# Altium PCB PCI Express Mini_3000X5095_52PIN_Full-Mini-Type F1.PCBDOC (part 8 of 8)
Units mm, origin at the board's own origin, x right, y up, seen from the top; angles counter-clockwise.
Board outline 70 x 83.2 mm, 6 copper layers (TopLayer, Layer 1, Layer 2, Layer 3, Layer 4, Bottom Layer), stack 0.914 mm thick; 380 components, 252 nets, 1258 pads, 603 vias.
Unrouted connection lines stored in the file: 10.
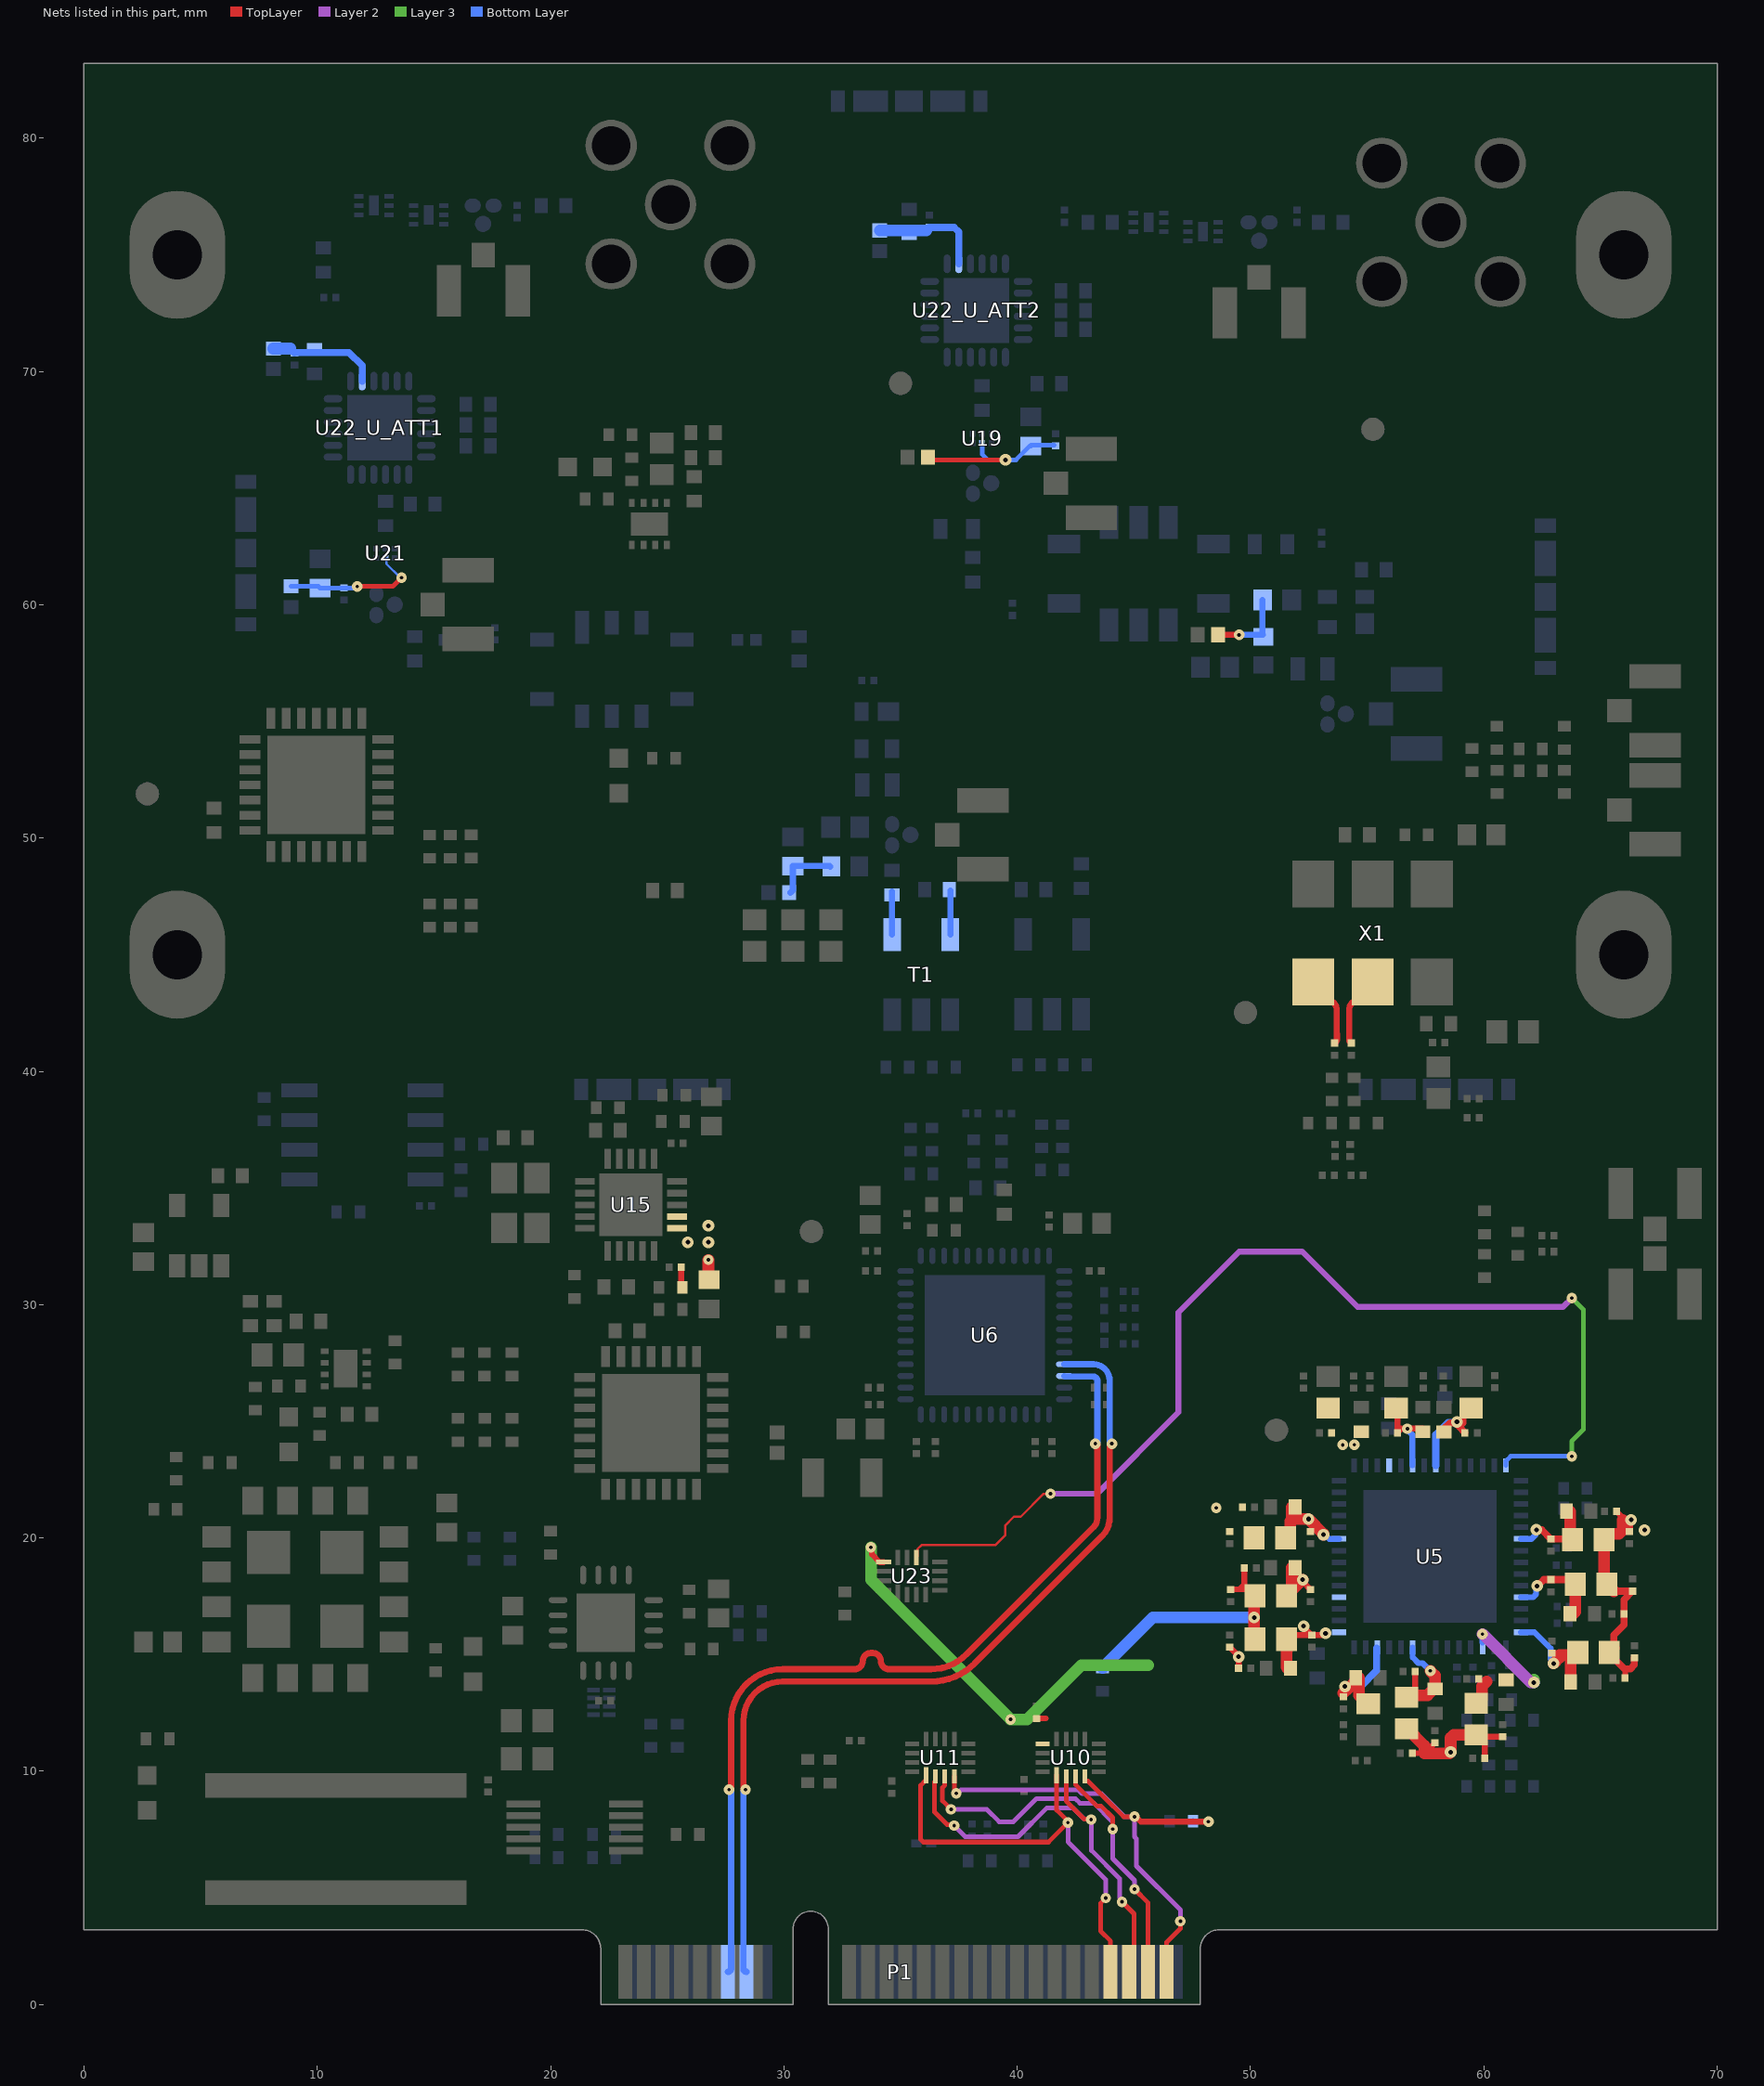
[diagram p9: the nets of this part, all layers, seen from the top]

## Via types
v1: diameter 0.45, hole 0.15, TopLayer to Bottom Layer, tented both sides, 332 vias
v2: diameter 0.5, hole 0.2, TopLayer to Bottom Layer, tented both sides, 214 vias
v3: diameter 0.5, hole 0.2, TopLayer to Bottom Layer, 32 vias
v4: diameter 0.45, hole 0.15, TopLayer to Bottom Layer, 25 vias

## Nets (pads, with @x,y where several pads share a name; then routed paths per layer and width w, separated by ;. In a path a pad name is that pad's centre, name@x,y a point inside that pad or via, vN(x,y) a via of type N, cw(c..) or ccw(c..) an arc to the next point about the centre after c; other vN are vias at no path point) (continued)
SPI_1V8_CLK: C71.1 C113.2 C114.2 C117.2 C118.2 C121.2 C122.2 C125.2 C126.2 C131.2 C132.2 C135.2 C136.2 C141.2 C142.2 C143.2 C144.2 C147.2 C148.2 FB13.1 FB14.1 FB16.1 FB17.1 FB18.1 FB19.1 FB20.1 FB21.1 R12.2 R102.2 U10.13 U15.11 U15.12 U23.13 | length 50.9
  TopLayer w0.25: R102.2@25.596,30.74 25.601,30.745 25.601,31.591 C142.2@25.606,31.596 ; v1(33.732,19.594) 33.77,19.556 33.77,19.296 34.102,18.964 U23.13@34.277,18.964 ; C71.1@40.84,12.264 41.23,12.264 ; C118.2@49.099,15.316 49.109,15.316 49.495,14.93 v2(49.495,14.909) 49.491,14.904 49.491,14.418 C117.2@49.487,14.414 ; C125.2@49.14,17.796 49.528,17.796 ; C126.2@49.739,18.718 49.739,18.007 49.528,17.796 ; FB17.1@50.197,17.514 49.915,17.796 49.528,17.796 ; C148.2@56.944,10.769 57.453,10.769 C147.2@57.909,11.225 ; FB13.1@59.671,11.565 59.712,11.565 FB13.1@59.799,11.479 ; C114.2@60.037,10.557 60.037,11.24 FB13.1@59.799,11.479 ; C113.2@60.802,11.479 FB13.1@59.799,11.479 ; C121.2@65.695,21.145 65.695,21.135 65.955,20.875 65.955,20.777 ; 66.033,14.384 66.059,14.358 C144.2@66.059,13.993 ; C122.2@66.24,20.269 66.265,20.294 66.265,20.729 v2(66.313,20.777)
  TopLayer w0.3: FB20.1@65.379,15.038 66.033,14.384 66.281,14.384 66.457,14.56 C143.2@66.457,14.853 ; FB18.1@65.571,17.717 C132.2@66.373,17.717 66.009,17.354 C131.2@66.009,16.751 66.009,16.271 65.579,15.841 FB20.1@65.579,15.288
  TopLayer w0.5: v4(26.764,31.921) 26.764,31.089 C141.2@26.788,31.065 ; FB14.1@50.197,15.657 50.161,15.693 v2(50.161,16.586) 50.161,17.478 FB17.1@50.197,17.514 ; FB21.1@56.684,11.817 56.734,11.817 57.453,11.098 57.453,10.769 58.526,10.769 v2(58.578,10.821) 58.578,11.43 58.714,11.565 FB13.1@59.671,11.565 ; FB20.1@65.379,15.038 FB20.1@65.379,15.088 FB20.1@65.579,15.288 ; FB18.1@65.571,17.717 65.524,17.764 65.474,17.764 65.274,17.964 FB18.1@65.274,18.014 65.156,18.132 65.156,19.978 65.356,20.178 65.794,20.178 65.955,20.34 65.955,20.777
  Layer 3 w0.5: v1(33.732,19.594) 33.732,18.207 v4(39.717,12.222) 40.425,12.222 42.754,14.55 45.61,14.55 45.615,14.545
  Bottom Layer w0.25: R12.2@43.647,14.39 R12.2@43.658,14.379
  Bottom Layer w0.5: R12.2@43.658,14.429 45.814,16.586 v2(50.161,16.586)
  other v1: 48.532,21.289
  other v2: 66.89,20.338 25.883,32.673 26.764,32.673 26.764,33.382
SPI_CLK_MB: P1.45 U10.1 U11.1 | length 19.2
  TopLayer w0.2: U11.1@36.1,9.829 36.1,9.579 36.05,9.579 35.863,9.392 35.863,7.08 35.98,6.963 41.341,6.963 v4(42.176,7.798) 42.176,7.855 41.695,8.336 U10.1@41.695,9.829 ; v1(43.797,4.566) 43.572,4.341 43.572,3.149 44,2.721 P1.45@44,1.4
  Layer 2 w0.2: v4(42.176,7.798) 42.176,6.974 43.797,5.353 v1(43.797,4.566)
SPI_MISO_MB: P1.49 U10.3 U11.3 | length 19.7
  TopLayer w0.2: U11.3@36.9,9.779 36.9,9.392 36.8,9.292 36.8,8.731 v1(37.165,8.366) ; U10.3@42.495,9.779 42.495,9.425 43.411,8.51 43.591,8.51 44.096,8.006 v4(44.096,7.517) ; v1(45.027,4.946) 45.6,4.373 P1.49@45.6,1.4
  Layer 2 w0.2: v1(37.165,8.366) 38.694,8.366 39.224,7.835 39.833,7.835 40.823,8.826 42.492,8.826 42.686,8.632 43.293,8.632 44.096,7.829 v4(44.096,7.517) 44.096,6.254 45.027,5.323 v1(45.027,4.946)
SPI_MOSI_MB: P1.47 U10.2 U11.2 | length 19.3
  TopLayer w0.2: U11.2@36.5,9.779 36.5,9.579 36.45,9.529 36.45,8.254 36.987,7.716 37.251,7.716 v1(37.299,7.668) ; U10.2@42.095,9.779 42.095,8.728 42.873,7.95 43.148,7.95 v4(43.17,7.928) ; v1(44.494,4.402) 45.006,3.89 45.006,2.567 45,2.561 45,1.6 P1.47@44.8,1.4
  Layer 2 w0.2: v1(37.299,7.668) 37.776,7.191 40.033,7.191 41.261,8.419 42.404,8.419 42.873,7.95 43.066,7.95 43.089,7.928 v4(43.17,7.928) ; v4@43.183,7.95 43.183,6.601 44.384,5.4 44.384,4.566 44.494,4.456 v1(44.494,4.402)
SPI_nCS_1_MB: P1.51 R64.2 U10.4 U11.4 | length 23.5
  TopLayer w0.2: U11.4@37.3,9.779 37.3,9.173 37.385,9.088 v1(37.385,9.049) ; U10.4@42.895,9.779 42.895,9.579 43.031,9.579 43.75,8.86 ; 43.751,8.86 44.559,8.052 v4(45.027,8.052) ; P1.51@46.4,1.4 46.4,2.665 46.995,3.26 v1(46.995,3.569)
  TopLayer w0.25: v4(45.027,8.052) 45.081,8.052 45.298,7.835 v1(48.197,7.835)
  Layer 2 w0.2: v1(37.385,9.049) 37.453,9.049 37.595,9.192 42.621,9.192 42.777,9.036 43.615,9.036 44.599,8.052 v4(45.027,8.052) 45.027,7.191 45.11,7.107 45.11,5.939 46.995,4.054 v1(46.995,3.569)
  Bottom Layer w0.25: R64.2@47.532,7.858 47.544,7.846 48.185,7.846 v1(48.197,7.835)
Sync_04610: U5.14 U23.10 | length 47.9
  TopLayer w0.1: U23.10@35.677,19.164 35.727,19.214 35.727,19.522 35.898,19.694 39.063,19.694 39.481,20.113 39.481,20.527 39.864,20.909 40.149,20.909 41.131,21.892 v1(41.431,21.892)
  Layer 2 w0.25: v1(41.431,21.892) 43.416,21.892 46.912,25.387 46.912,29.67 49.516,32.273 52.216,32.273 54.588,29.902 63.394,29.902 v1(63.775,30.282)
  Layer 3 w0.2: v1(63.775,23.499) 63.775,24.151 64.263,24.639 64.263,29.795 v1(63.775,30.282)
  Bottom Layer w0.2: U5.14@60.943,23.106 60.943,23.286 61.156,23.499 v1(63.775,23.499)
SYNC_N: P1.12 U6.22 | length 38.9
  TopLayer w0.267: v1(27.645,9.209) ccw(c27.645,9.3) 27.737,9.3 27.737,10.722 27.74,10.722 27.74,12.169 cw(c29.945,12.169) 29.945,14.373 32.899,14.373 33.033,14.373 ccw(c33.033,14.722) 33.381,14.722 cw(c33.73,14.722) 33.73,15.07 33.808,15.07 cw(c33.808,14.722) 34.156,14.722 ccw(c34.505,14.722) 34.505,14.373 36.313,14.373 36.739,14.417 ccw(c36.313,16.476) 36.872,14.449 ccw(c36.313,16.476) 37.8,14.989 43.265,20.454 ccw(c42.842,20.876) 43.44,20.876 43.44,23.947 ccw(c43.348,23.947) v1(43.348,24.039)
  Bottom Layer w0.267: P1.12@27.6,1.4 ccw(c27.6,1.537) 27.737,1.537 27.737,9.117 ccw(c27.645,9.117) v1(27.645,9.209) ; U6.22@42.017,26.942 42.044,26.915 43.264,26.915 cw(c43.264,26.743) 43.437,26.743 43.437,24.128 cw(c43.348,24.128) v1(43.348,24.039)
SYNC_P: P1.14 U6.21 | length 39.1
  TopLayer w0.267: v1(28.355,9.209) cw(c28.355,9.3) 28.264,9.3 28.264,12.169 28.267,12.169 cw(c29.945,12.169) 29.945,13.846 36.314,13.846 ccw(c36.314,16.474) 38.172,14.616 43.639,20.083 ccw(c42.848,20.874) 43.967,20.874 43.967,23.947 cw(c44.058,23.947) v1(44.058,24.039)
  Bottom Layer w0.267: P1.14@28.267,1.533 P1.14@28.4,1.4 cw(c28.4,1.536) 28.264,1.536 28.264,9.117 cw(c28.355,9.117) v1(28.355,9.209) ; U6.21@42.017,27.442 43.264,27.442 cw(c43.264,26.743) 43.964,26.743 43.964,24.133 ccw(c44.058,24.133) v1(44.058,24.039)
TorRF_50Ohm_20: C175.1 T1.5 | length 1.8
  Bottom Layer w0.268: T1.5@34.637,45.859 C175.1@34.637,47.7
TorRF_50Ohm_21: C156.1 T1.4 | length 1.9
  Bottom Layer w0.269: T1.4@37.137,45.859 C156.1@37.137,47.755
Vcc_2V8_Tor1: C176.2 C177.2 FB22.2 U21.2 | length 6.1
  TopLayer w0.2: v1(11.709,60.786) 13.232,60.786 13.609,61.163 v1(13.611,61.163)
  Bottom Layer w0.1: U21.2@12.961,61.976 12.966,61.972 12.966,61.755 13.558,61.163 v1(13.611,61.163)
  Bottom Layer w0.2: FB22.2@8.876,60.786 10.056,60.786 C176.2@10.121,60.721 C177.2@11.149,60.721 11.59,60.721 11.655,60.786 v1(11.709,60.786)
Vcc_2V8_Tor2: C165.2 C166.2 FB23.2 U19.2 | length 7.3
  TopLayer w0.2: FB23.2@36.181,66.331 36.297,66.215 v2(39.498,66.215)
  Bottom Layer w0.2: U19.2@38.498,66.931 38.498,66.448 38.732,66.215 v2(39.498,66.215) 39.947,66.215 40.539,66.807 C165.2@40.589,66.807 ; C165.2@40.589,66.837 C166.2@41.585,66.837
Vcc_5V_AMP_1: C171.1 FB26.2 R126.2 | length 2.8
  Bottom Layer w0.269: FB26.2@30.28,47.665 30.384,47.769 C171.1@30.384,48.803 31.96,48.803 R126.2@31.983,48.78
Vcc_5V_AMP_2: C161.1 FB27.2 R84.2 | length 3.4
  TopLayer w0.268: FB27.2@48.615,58.715 FB27.2@48.618,58.712
  TopLayer w0.269: FB27.2@48.618,58.712 v1@49.507,58.712
  TopLayer w0.279: v1@49.507,58.712 v1(49.51,58.71)
  Bottom Layer w0.268: R84.2@50.516,58.71 C161.1@50.516,60.21
  Bottom Layer w0.269: v1(49.51,58.71) R84.2@50.516,58.71
Vcc_5V_ATT_1: C180_U_ATT1.2 C181_U_ATT1.2 FB24.2 U22_U_ATT1.2 | length 4.8
  Bottom Layer w0.3: 8.846,70.98 C180_U_ATT1.2@9.026,70.8 9.041,70.815 11.358,70.815 11.926,70.247 U22_U_ATT1.2@11.926,69.581
  Bottom Layer w0.5: FB24.2@8.118,70.98 8.846,70.98
Vcc_5V_ATT_2: C180_U_ATT2.2 C181_U_ATT2.2 FB25.2 U22_U_ATT2.2 | length 4.7
  Bottom Layer w0.3: C180_U_ATT2.2@36.232,76.174 37.307,76.174 37.498,75.983 U22_U_ATT2.2@37.498,74.614
  Bottom Layer w0.5: FB25.2@34.108,76.044 35.385,76.044 C180_U_ATT2.2@36.102,76.044
VCXO_OUT_N: C43.2 X1.5 | length 3.1
  TopLayer w0.267: C43.2@54.271,41.256 54.313,41.215 C43.2@54.323,41.215 ; C43.2@54.271,41.256 cw(c54.371,41.356) 54.23,41.356 54.23,42.136 54.227,42.14 54.227,42.627 cw(c54.66,42.627) 54.354,42.933 cw(c54.425,42.862) 54.425,42.963 ccw(c54.425,43.064) X1.5@54.496,42.992 ; X1.5@54.496,42.993 55.162,43.659 ccw(c54.992,43.829) X1.5@55.233,43.829
VCXO_OUT_P: C40.2 X1.4 | length 3.1
  TopLayer w0.267: X1.4@52.693,43.829 ccw(c52.935,43.829) 52.764,43.659 53.43,42.993 ccw(c53.501,43.064) 53.501,42.963 cw(c53.501,42.862) 53.573,42.933 cw(c53.267,42.627) 53.7,42.627 53.7,41.616 53.703,41.613 53.703,41.356 cw(c53.562,41.356) 53.661,41.256 53.62,41.215 C40.2@53.61,41.215
VDD_CORE: C95.2 C96.2 FB8.2 U5.8 | length 4.6
  TopLayer w0.3: C96.2@58.285,24.683 58.54,24.937 58.81,24.937 v2(58.848,24.976) ; v2@58.848,24.846 59.029,24.846 59.104,24.921 59.104,25.263 59.404,25.563 FB8.2@59.454,25.563 ; v2@58.947,24.764 59.194,24.518 C95.2@59.194,24.508
  Bottom Layer w0.3: U5.8@57.943,23.106 57.943,24.426 58.472,24.956 58.828,24.956 v2(58.848,24.976)
VDD_IO: C115.2 C116.2 FB13.2 U5.31 | length 4.7
  TopLayer w0.5: FB13.2@59.671,12.915 59.721,12.915 59.921,13.115 59.921,13.643 60.127,13.85
  Layer 2 w0.5: v1(59.943,15.877) 62.015,13.805 v2(62.144,13.805)
  Layer 3 w0.5: v2(62.144,13.805) v2@62.144,13.929
  Bottom Layer w0.25: U5.31@59.943,15.521 v1(59.943,15.877)
VDD_OSC: C149.2 C150.2 FB21.2 U5.37 | length 4.9
  TopLayer w0.25: FB21.2@56.684,13.167 56.729,13.167 56.929,13.367 57.054,13.492 C149.2@57.054,14.273
  TopLayer w0.5: FB21.2@56.684,13.167 56.773,13.256 57.584,13.256 57.859,13.531 C150.2@57.909,13.531 57.909,14.1 v1(57.708,14.301)
  Bottom Layer w0.25: U5.37@56.951,15.298 56.951,14.874 57.191,14.634 57.375,14.634 v1(57.708,14.301)
VDD_PLL1: C99.2 C100.2 FB9.2 U5.40 | length 4.8
  TopLayer w0.5: 53.978,13.352 54.153,13.528 54.637,14.012 54.642,14.012 54.642,13.251 54.999,12.894 FB9.2@55.049,12.894
  Bottom Layer w0.3: v2(54.045,13.636) 54.72,13.636 55.409,14.325 U5.40@55.409,15.273
VDD_PLL2CORE: C103.2 C104.2 FB10.2 U5.6 | length 3.7
  TopLayer w0.25: FB10.2@56.239,25.563 56.297,25.505 C103.2@56.297,24.514 ; C103.2@56.297,24.504 C103.2@56.297,24.514 ; 56.471,24.688 C103.2@56.297,24.514 ; v1@56.724,24.688 C104.2@57.383,24.688
  Bottom Layer w0.25: v1(56.724,24.682) 56.724,24.642 56.943,24.423 U5.6@56.943,23.106
VDD_PLL2OSC: C107.2 C108.2 FB11.2 U5.4
  other v1: 53.951,23.989 54.447,23.992
VDDO_1/2: C123.2 C124.2 FB16.2 U5.20 | length 3.9
  TopLayer w0.3: v2(62.255,20.345) 62.479,20.345 62.874,19.95 C123.2@62.884,19.96 FB16.2@63.775,19.96
  TopLayer w0.5: C124.2@63.675,21.145 63.68,21.145 63.7,21.125 63.7,20.035 63.775,19.96 FB16.2@63.806,19.928
  Bottom Layer w0.25: U5.20@61.593,19.956 62.04,19.956 62.208,20.123 62.208,20.298 v2(62.255,20.345)
VDDO_3/4: C133.2 C134.2 FB18.2 U5.25 | length 4.2
  TopLayer w0.3: v2(62.289,17.94) 62.562,18.214 C133.2@62.884,18.214 FB18.2@63.725,18.214
  TopLayer w0.5: FB18.2@63.725,18.214 FB18.2@63.924,18.014 63.924,16.841 63.834,16.751 C134.2@63.829,16.751
  Bottom Layer w0.25: U5.25@61.593,17.456 62.109,17.456 62.241,17.588 62.241,17.892 v2(62.289,17.94)
VDDO_5: C145.2 C146.2 FB20.2 U5.28 | length 5.1
  TopLayer w0.25: C145.2@62.911,15.064 63.236,15.064
  TopLayer w0.5: v2(62.987,14.615) 63.236,14.864 ; 63.236,14.977 63.918,14.977 FB20.2@64.029,15.088 FB20.2@63.84,14.899 ; C146.2@63.722,13.824 FB20.2@63.722,14.899
  Bottom Layer w0.25: U5.28@61.593,15.956 62.172,15.956 62.862,15.266 62.862,14.808 62.987,14.683 v2(62.987,14.615)
VDDO_6: C119.2 C120.2 FB14.2 U5.43 | length 3.6
  TopLayer w0.25: FB14.2@51.547,15.657 51.725,15.836 C119.2@52.624,15.836 ; v2(52.277,16.216) 52.277,16.182 C119.2@52.624,15.836 ; v2(53.217,15.911) 53.149,15.911 53.073,15.836 C119.2@52.634,15.836 C119.2@52.624,15.836
  TopLayer w0.5: FB14.2@51.547,15.657 51.565,15.639 51.565,15.176 51.54,15.151 51.54,14.458 C120.2@51.584,14.414
VDDO_7/8: C127.2 C128.2 FB17.2 U5.46 | length 2.2
  TopLayer w0.25: v2(52.235,18.211) 52.282,18.163 52.282,18.079 52.566,17.796 C127.2@52.576,17.796
  TopLayer w0.5: C128.2@51.773,18.718 51.773,17.749 v2(52.235,18.211)
VDDO_9/10: C137.2 C138.2 FB19.2 U5.51 | length 3.8
  TopLayer w0.5: FB19.2@51.5,20.009 51.7,20.209 51.7,20.72 51.764,20.784 ; C138.2@51.778,21.323 51.764,21.309 51.764,20.784 ; v2(53.128,20.14) 53.128,20.172 v2(52.488,20.811) 51.792,20.811 51.764,20.784
  Bottom Layer w0.25: v2(53.128,20.14) 53.195,20.14 53.379,19.956 U5.51@53.793,19.956
pads on no net: D8_U_RF_ANT_L.1 D8_U_RF_ANT_L.3 D8_U_RF_ANT_L.4 D8_U_RF_ANT_L.6 D8_U_RF_ANT_M.1 D8_U_RF_ANT_M.3 D8_U_RF_ANT_M.4 D8_U_RF_ANT_M.6 FID1.0 FID2.0 FID3.0 FID4.0 FID5.0 FID6.0 H1.1 H2.1 H3.1 H4.1 H5.1 T1.2 T2.2 U1.5 U1.6 U1.7 U1.8 U1.14 U1.15 U3.6 U4.6 U5. U5.1 U5.2 U5.3 U5.18 U5.19 U5.23 U5.24 U5.35 U5.36 U5.44 U5.45 U5.47 U5.48 U5.52 U5.53 U5.56 U6.27 U6.28 U6.33 U6.34 U7.7 U7.10 U7.15 U7.16 U8.7 U8.10 U8.15 U8.16 U8.25 U8.26 U8.27 U14.8 U17.1 U17.2 U23.5 U23.14 U23.15 X1.2

## Polygon pours and split planes (outlines as drawn)
GND on TopLayer "GND_L01_P195" (solid, remove dead copper, pour order 195): 20.973,30.184 27.435,30.184 28.087,30.837 28.087,37.67 27.489,38.268 24.023,38.268 0.356,38.268 0.356,57.803 12.267,57.803 17.158,52.912 17.158,51.731 23.112,45.777 41.072,45.777 42.639,47.343 42.639,53.45 45.265,56.076 63.397,56.076 65.67,58.349 69.441,58.349 69.441,5.029 69.644,4.826 68.425,3.606 48.105,3.606 47.038,2.54 32.343,2.54 31.974,2.908 31.974,3.861 31.924,3.861 31.595,4.191 30.553,4.191 30.288,3.925 30.288,2.908 29.97,2.59 24.584,2.59 24.584,5.983 19.194,10.154 19.194,16.402 18.807,16.789 18.374,16.789 16.383,18.78 16.383,22.285 15.114,23.554 15.114,28.441 16.857,30.184
PGND on TopLayer "PGND_L01_P196" (solid, remove dead copper, pour order 196): 18.357,13.333 19,12.69 19,10.13 19.48,9.65 20.466,9.659 24.59,5.535 24.59,3.391 0.647,3.391 0.356,3.683 0.356,38.1 17.968,38.1 18.593,37.475 18.593,32.724 17.974,32.104 15.017,32.104 11.472,28.559 11.029,28.559 10.602,28.131 10.602,26.138 10.809,25.931 10.953,25.931 10.953,25.913 11.302,25.564 11.757,25.564 11.757,24.614 12.051,24.32 13.09,24.32 13.487,23.922 13.487,22.568 12.725,21.806 12.725,14.534 13.927,13.333
2122_VCC on TopLayer "2122_VCC_L01_P188" (solid, pour order 188): 28.49,24.101 28.097,24.494 28.097,26.303 30.344,26.303 30.707,25.939 30.707,24.32 30.488,24.101
SPI_1V8_CLK on TopLayer "SPI_1V8_CLK_L01_P057" (solid, remove dead copper, pour order 57): 39.465,12.515 41.395,12.506 41.395,11.043 39.465,11.043
4610_FINE_V on TopLayer "4610_FINE_V_L01_P040" (solid, remove dead copper, pour order 40): 56.424,39.736 59.648,39.736 59.648,35.87 56.424,35.87
3V3_MB on TopLayer "3V3_MB_L01_P190" (solid, remove dead copper, pour order 190): 36.2,11.279 34.113,11.279 33.765,10.931 33.765,9.266 33.94,9.091 36.2,9.091
GND_ATT_U_ATT1 on TopLayer "GND_ATT_U_ATT1_L01_P198" (solid, remove dead copper, pour order 198): 0.5,81.42 0.5,58.009 12.451,58.009 17.367,53.094 17.367,51.855 23.169,46.052 40.99,46.052 42.372,47.434 42.372,53.635 45.148,56.41 69.441,56.41 69.441,81.293
4610_FINE_V on TopLayer "4610_FINE_V_L01_P181" (solid, remove dead copper, pour order 181): 51.486,26.463 62.316,26.463 ccw(c61.595,27.026) 62.509,27.026 ccw(c60.843,27.026) 60.843,28.692 52.213,28.692 ccw(c52.213,27.965) 51.486,27.965
3V3_MB on TopLayer "3V3_MB_L01_P041" (solid, remove dead copper, pour order 41): 41.393,10.881 39.429,10.881 39.063,10.515 39.063,9.584 39.258,9.389 41.506,9.389 41.595,9.479 41.595,10.679
3V6_DCDC on TopLayer "3V6_DCDC_L01_P193" (solid, remove dead copper, pour order 193): 18.583,37.524 18.583,36.679 18.786,36.487 18.786,32.574 18.146,31.934 15.108,31.934 11.815,28.641 11.815,24.754 12.116,24.454 13.053,24.454 13.562,23.944 13.562,22.483 12.685,21.605 12.685,14.768 12.785,14.668 18.866,14.668 19.437,15.239 19.437,15.809 20.658,15.809 20.723,15.744 21.123,16.144 21.123,17.609 21.404,17.889 22.4,17.889 22.4,18.97 21.849,19.494 19.224,19.494 15.76,22.958 15.288,23.373 15.288,28.739 16.834,30.285 20.002,30.285 21.895,32.178 21.895,36.928 20.323,38.5 18.385,38.5 18.251,38.367 18.251,37.855
VDD_PLL2OSC on TopLayer "VDD_PLL2OSC_L01_P044" (solid, remove dead copper, pour order 44): 52.28,26.225 54.284,26.225 54.284,25.193 55.427,25.193 55.427,23.75 53.4,23.75 53.208,23.943 53.208,24.591 52.945,24.853 52.28,24.853
12V on TopLayer "12V_L01_P192" (solid, remove dead copper, pour order 192): 2.1,30.677 2.1,32.237 2.395,32.532 4.495,32.532 4.495,22.566 6.285,20.776 6.285,12.574 7.79,11.069 15.841,11.084 16.389,10.536 16.389,8.865 4.688,8.865 3.209,10.344 3.209,16.772 2.689,17.274 2.689,30.088
SPI_1V8_ADC on TopLayer "SPI_1V8_ADC_L01_P185" (solid, remove dead copper, pour order 185): 32.171,22.294 32.171,21.589 31.541,20.959 31.541,18.748 30.038,17.245 29.019,17.25 cw(c28.925,18.211) 28.925,17.245 25.379,17.245 ccw(c25.379,17.041) 25.174,17.041 25.174,16.044 cw(c24.793,16.044) 24.793,15.663 24.387,15.663 cw(c24.387,16.027) 24.023,16.027 24.023,17.334 ccw(c23.748,17.334) 23.748,17.609 22.817,17.609 cw(c22.817,17.973) 22.453,17.973 22.453,19.344 22.711,19.602 28.39,19.602 29.382,20.594 29.348,20.628 29.348,23.644 29.348,23.96 29.575,24.186 31.876,24.186 32.171,23.891
3V3_DIGIT on TopLayer "3V3_DIGIT_L01_P191" (solid, remove dead copper, pour order 191): 7.881,29.735 7.881,25.875 6.951,25.875 6.234,26.592 6.234,29.087 6.882,29.735
NetC7_2 on TopLayer "NETC7_2_L01_P042" (solid, remove dead copper, pour order 42): 8.151,29.623 8.387,29.858 9.624,29.858 9.783,29.7 9.783,28.74 10.336,28.74 10.758,28.318 10.758,26.807 8.886,26.807 8.886,26.08 8.793,25.987 8.006,25.987 7.639,26.354 7.639,26.984 7.881,27.227 7.881,29.623
4610_FINE_V on TopLayer "4610_FINE_V_L01_P182" (solid, pour order 182): 54.495,10.271 54.665,10.441 54.665,10.821 55.766,10.821 56.061,11.129 56.061,11.44 ccw(c55.324,11.44) 55.845,11.961 55.584,12.222 54.577,12.222 54.199,11.844 53.149,11.844 52.809,11.504 52.809,10.556 53.096,10.278 ccw(c53.165,10.627) 53.165,10.271
2122_VCC on TopLayer "2122_VCC_L01_P178" (solid, pour order 178): 41.476,33.495 ccw(c41.476,33.817) 41.797,33.817 cw(c42.269,33.817) 42.269,34.288 42.714,34.288 cw(c42.714,33.867) 43.134,33.867 43.134,32.383 ccw(c43.294,32.383) 43.294,32.223 cw(c43.294,32.069) 43.448,32.069 43.448,31.327 cw(c43.198,31.327) 43.198,31.077 41.711,31.077 cw(c41.711,31.54) 41.247,31.54 41.247,32.128 ccw(c40.961,32.128) 40.961,32.415 cw(c40.961,32.628) 40.747,32.628 40.747,33.388 cw(c40.854,33.388) 40.854,33.495
VDD_IO on TopLayer "VDD_IO_L01_P176" (solid, remove dead copper, pour order 176): 59.001,13.6 58.839,13.438 58.839,12.597 59.071,12.365 60.271,12.365 60.438,12.533 60.438,12.927 60.438,13.121 cw(c60.707,13.121) 60.707,13.39 60.997,13.39 61.325,13.39 cw(c61.325,13.231) 61.481,13.262 61.481,12.946 61.477,12.943 61.685,12.735 62.32,12.735 ccw(c62.32,13.005) 62.441,12.764 62.59,12.911 62.59,14.238 ccw(c62.291,14.238) 62.584,14.296 62.349,14.538 59.561,14.538 ccw(c59.561,14.494) 59.517,14.494 59.517,13.95 cw(c59.167,13.95) 59.167,13.6
2122_0VDD on TopLayer "2122_0VDD_L01_P165" (solid, pour order 165): 35.31,25.868 35.1,25.658 35.1,24.454 35.677,23.877 36.762,23.877 37.057,24.172 37.057,25.582 36.696,25.934 ccw(c36.608,25.494) 36.608,25.942 35.383,25.942
2122_0VDD on TopLayer "2122_0VDD_L01_P163" (solid, pour order 163): 42,24.937 ccw(c41.295,24.937) 41.295,25.642 40.867,25.642 ccw(c40.867,25.017) 40.242,25.017 40.242,24.202 ccw(c40.535,24.202) 40.535,23.909 41.682,23.909 ccw(c41.682,24.227) 42,24.227
2122_VCC on TopLayer "2122_VCC_L01_P161" (solid, pour order 161): 41.5,26.788 43.212,26.788 cw(c43.212,26.567) 43.433,26.567 43.433,25.625 cw(c43.1,25.625) 43.1,25.292 41.717,25.292 cw(c41.717,25.517) 41.492,25.517
4610_FINE_V on TopLayer "4610_FINE_V_L01_P076" (solid, pour order 76): 27.298,38.094 27.425,37.967 27.425,34.803 27.238,34.616 26.383,34.62 cw(c26.294,35.516) 26.294,34.616 25.174,34.616 cw(c25.174,34.838) 24.952,34.838 24.952,36.08 cw(c25.103,36.08) 25.103,36.231 ccw(c25.103,36.331) 25.174,36.26 ccw(c25.174,36.433) 25.346,36.433 25.346,38.094
GND_VCXO on TopLayer "GND_VCXO_L01_P056" (solid, remove dead copper, pour order 56): 51.373,50.23 51.553,50.41 53.909,50.41 54.462,50.41 54.561,50.41 54.616,50.355 54.616,49.247 54.559,49.19 53.986,49.19 53.986,47.006 54.129,46.863 59.596,46.863 61.158,45.301 61.158,41.301 60.65,40.792 58.396,40.792 58.248,40.941 58.248,42.529 58.373,42.529 58.673,42.829 58.673,45.129 52.064,45.129 51.373,45.82
2122_0VDD on TopLayer "2122_0VDD_L01_P053" (solid, remove dead copper, pour order 53): 33.049,23.881 35.677,23.881 35.677,21.315 33.049,21.315
2122_VCC on TopLayer "2122_VCC_L01_P052" (solid, remove dead copper, pour order 52): 33.255,32.858 33.649,32.463 33.644,31.282 33.892,31.035 35.387,31.035 36.067,31.716 36.067,32.37 36.967,32.37 36.967,33.828 34.372,33.828 33.255,33.828
2122_VCC on TopLayer "2122_VCC_L01_P050" (solid, remove dead copper, pour order 50): 33.716,27.007 34.884,27.007 35.1,26.791 35.1,24.03 35.027,23.957 33.576,23.957 33.274,24.258 33.274,25.08 33.54,25.346 33.681,25.346 33.885,25.55 33.885,26.627 33.709,26.802
SPI_1V8_CLK on TopLayer "SPI_1V8_CLK_L01_P048" (solid, pour order 48): 25.046,30.091 24.995,30.142 24.995,33.697 cw(c25.217,33.697) 25.217,33.919 26.338,33.919 cw(c26.338,33.019) 27.238,33.019 27.238,30.456 26.873,30.091
SPI_1V8_CLK on TopLayer "SPI_1V8_CLK_L01_P043" (solid, remove dead copper, pour order 43): 50.715,19.384 48.549,19.384 48.228,19.691 48.228,21.792 48.243,21.806 48.707,22.072 49.435,22.072 50.024,21.483 50.024,21.151 50.212,20.963 50.788,20.963 51.05,20.701 51.05,19.691 51.021,19.691
GND on Layer 1 "GND_L02_P177" (solid, remove dead copper, pour order 177): 22.15,2.4 ccw(c21.35,2.4) 21.35,3.2 0,3.2 0,83.2 70,83.2 70,3.2 48.65,3.2 ccw(c48.65,2.4) 47.85,2.4 47.85,0 31.9,0 31.9,3.25 ccw(c31.15,3.25) 30.4,3.25 30.4,0 22.15,0
PGND on Layer 1 "PGND_L02_P172" (solid, remove dead copper, pour order 172): 24.152,37.991 26.956,37.991 27.531,37.417 27.531,31.03 26.032,29.531 15.656,29.531 14.818,28.692 14.818,23.485 16.101,22.203 16.101,18.539 18.101,16.538 18.645,16.538 18.974,16.209 18.974,11.145 22.834,7.285 24.46,5.659 24.46,2.54 22.885,2.54 22.885,2.591 22.25,3.226 0.686,3.226 0.178,3.734 0.178,34.925 3.244,37.991
4610_FINE_V on Layer 2 "4610_FINE_V_L03_P087" (solid, pour order 87): 51.785,25.578 cw(c51.785,25.928) 51.435,25.928 51.437,26.163 cw(c51.562,26.187) 51.435,26.187 51.435,27.915 cw(c52.213,27.915) 52.213,28.692 57.566,28.692 cw(c57.566,27.229) 59.03,27.229 cw(c57.912,27.229) 57.912,26.111 56.642,26.111 ccw(c56.642,25.527) 56.058,25.527 56.058,11.074 cw(c55.423,11.074) 56.046,10.951 cw(c55.377,10.943) 55.384,10.275 53.157,10.275 cw(c53.157,10.625) 52.807,10.625 52.807,12.802 cw(c52.934,12.802) 52.934,12.929 ccw(c52.934,13.03) 53.035,13.03 53.035,25.07 ccw(c52.527,25.07) 52.527,25.578
2122_VCC on Layer 2 "2122_VCC_L03_P079" (solid, pour order 79): 33.096,27.076 cw(c32.033,27.076) 32.033,26.013 29.035,26.013 ccw(c29.035,25.298) 28.321,25.298 28.321,24.358 ccw(c28.593,24.358) 28.593,24.085 30.567,24.085 cw(c30.57,23.878) 30.777,23.881 ccw(c30.886,24.994) 30.886,23.876 34.112,23.876 ccw(c34.112,24.359) 34.595,24.359 34.595,31.902 cw(c35.128,31.902) 35.128,32.436 42.095,32.436 cw(c42.095,32.024) 42.507,32.024 42.507,26.022 ccw(c43.459,26.022) 43.459,25.07 ccw(c43.459,26.619) 45.009,26.619 45.009,33.17 ccw(c43.9,33.17) 43.9,34.279 33.847,34.279 ccw(c33.847,33.528) 33.096,33.528
2122_0VDD on Layer 2 "2122_0VDD_L03_P095" (solid, pour order 95): 33.368,23.559 34.566,23.559 ccw(c34.566,24.017) 35.024,24.017 35.024,25.067 cw(c35.677,25.067) 35.677,25.719 36.692,25.719 cw(c36.692,25.429) 36.982,25.429 36.982,24.142 cw(c34.442,24.142) 34.442,21.602 33.572,21.602 cw(c33.572,21.806) 33.368,21.806
no net on Layer 2 "NONET_L03_P093" (solid, pour order 93): 29.362,24.232
no net on Layer 2 "NONET_L03_P058" (solid, pour order 58): 24.765,28.905
4610_FINE_V on Layer 3 "4610_FINE_V_L04_P089" (solid, pour order 89): 22.707,30.011 cw(c22.276,30.011) 22.276,29.58 21.338,29.58 cw(c21.338,30.311) 20.607,30.311 20.607,38.241 cw(c21.075,38.241) 21.075,38.71 29.642,38.71 cw(c29.642,37.871) 30.48,37.871 ccw(c31.311,37.871) 31.311,37.04 59.919,37.04 cw(c59.919,34.5) 62.459,34.5 62.459,27.33 cw(c61.265,27.33) 61.265,26.137 55.202,26.137 cw(c55.202,28.677) 52.662,28.677 52.662,33.165 ccw(c51.562,33.165) 51.562,34.265 25.247,34.265 ccw(c25.247,31.725) 22.707,31.725
SPI_1V8_CLK on Layer 3 "SPI_1V8_CLK_L04_P078" (solid, remove dead copper, pour order 78): 49.434,34.061 50.739,32.756 50.739,23 50.739,14.935 ccw(c53.279,14.935) 53.279,12.395 54.625,12.395 63.348,12.395 ccw(c63.348,13.411) 64.364,13.411 64.364,21.292 cw(c64.789,21.292) 64.789,21.717 66.472,21.717 cw(c66.472,20.98) 67.208,20.98 67.208,12.573 cw(c64.668,12.573) 64.668,10.033 50.444,10.033 cw(c50.444,10.82) 49.657,10.82 ccw(c48.971,10.82) 48.971,11.506 47.727,11.506 cw(c47.727,14.046) 45.187,14.046 45.187,21.285 ccw(c42.721,21.286) 45.186,21.336 45.187,27.783 ccw(c42.647,27.783) 42.647,30.323 28.593,30.323 ccw(c28.448,27.804) 28.448,30.328 25.298,30.328 cw(c25.298,30.582) 25.044,30.582 25.044,34.036 25.324,34.061
2122_0VDD on Layer 3 "2122_0VDD_L04_P120" (solid, remove dead copper, pour order 120): 35.166,25.753 35.166,23.965 35.403,23.728 42.177,23.728 42.255,23.806 42.255,25.685 42.067,25.873 39.581,25.873 35.286,25.873
VDD_IO on Layer 3 "VDD_IO_L04_P112" (solid, pour order 112): 61.382,14.55 62.435,14.55 cw(c62.435,14.38) 62.605,14.38 62.605,13.086 cw(c62.241,13.086) 62.241,12.722 cw(c62.241,13.611) 61.351,13.611 61.351,14.476
no net on Layer 3 "NONET_L04_P083" (solid, pour order 83): 51.486,25.425
no net on Layer 3 "NONET_L04_P082" (solid, pour order 82): 51.79,27.965
GND on Bottom Layer "GND_L06_P186" (solid, remove dead copper, pour order 186): 17.31,52.273 17.31,42.668 20.797,39.181 20.84,39.225 26.763,39.226 26.764,39.225 67.379,39.225 69.596,37.008 69.596,4.387 68.536,3.327 32.313,3.327 31.977,3.663 31.977,4.064 30.445,4.064 30.242,3.861 30.242,3.024 29.947,2.728 25.207,2.728 24.895,3.04 24.895,5.3 24.734,5.3 22.241,7.792 20.369,7.792 13.523,14.639 13.523,20.339 11.602,22.26 8.729,22.26 1.346,29.642 1.346,55.093 14.49,55.093
3V3_DIGIT on Bottom Layer "3V3_DIGIT_L06_P183" (solid, remove dead copper, pour order 183): 19.025,12.781 19.025,13.742 20.625,13.742 20.774,13.593 22.249,13.593 22.249,12.881 19.56,12.881 19.46,12.781
2122_0VDD on Bottom Layer "2122_0VDD_L06_P077" (solid, pour order 77): 35.347,25.704 35.253,25.61 ccw(c35.393,25.552) 35.241,25.552 35.241,23.972 35.481,23.732 36.588,23.732 36.779,23.922 36.779,25.606 36.684,25.7 35.894,25.704
+12 on Bottom Layer "+12_L06_P168" (solid, pour order 168): 24.7,2.32 24.7,5.184 24.274,5.61 5.113,5.61 4.642,5.139 4.642,3.384 4.724,3.302 20.701,3.302 22.625,3.302 23.3,2.627 23.3,2.32
3V3_MB on Bottom Layer "3V3_MB_L06_P045" (solid, remove dead copper, pour order 45): 22.249,13.237 22.384,13.372 23.669,13.372 23.669,12.888 23.569,12.788 22.343,12.788 22.249,12.881
2122_VCC on Bottom Layer "2122_VCC_L06_P096" (solid, pour order 96): 44.104,25.742 43.929,25.567 41.603,25.567 41.504,25.666 41.504,26.792 44.038,26.792 44.104,26.727
VDD_CORE on Bottom Layer "VDD_CORE_L06_P106" (solid, pour order 106): 59.888,25.477 59.888,24.631 59.563,24.306 59.16,24.287 58.504,24.287 ccw(c58.504,23.845) 58.063,23.845 58.063,22.806 57.823,22.806 57.823,24.306 59.122,25.606 59.442,25.602 59.763,25.602
VDDO_1/2 on Bottom Layer "VDDO_1/2_L06_P103" (solid, pour order 103): 64.024,20.974 64.321,20.677 64.321,19.981 64.175,19.841 cw(c64.126,20.084) 64.126,19.836 61.293,19.836 61.293,20.356 61.91,20.974
VDDO_3/4 on Bottom Layer "VDDO_3/4_L06_P101" (solid, pour order 101): 61.293,17.576 62.23,18.514 64.333,18.514 64.449,18.397 64.449,17.786 64.291,17.628 63.623,17.628 ccw(c63.623,17.456) 63.452,17.456 cw(c63.272,17.456) 63.272,17.276 61.353,17.276 cw(c61.353,17.336) 61.293,17.336
2122_VCC on Bottom Layer "2122_VCC_L06_P099" (solid, pour order 99): 34.963,33.774 cw(c34.963,33.394) 35.343,33.394 ccw(c35.613,33.394) 35.613,33.124 35.623,33.124 cw(c35.623,32.505) 36.242,32.505 36.242,32.031 cw(c35.263,32.031) 35.263,31.052 34.07,31.052 cw(c34.07,31.455) 33.666,31.455 33.666,32.476 33.671,32.476 33.671,32.552 ccw(c33.481,32.552) 33.481,32.742 cw(c33.481,32.946) 33.276,32.946 33.276,33.841 ccw(c33.343,33.841) 33.343,33.774
VDDO_6 on Bottom Layer "VDDO_6_L06_P153" (solid, pour order 153): 54.138,16.129 53.14,16.129 cw(c53.14,16.336) 52.933,16.336 ccw(c52.773,16.336) 52.773,16.496 50.91,16.496 ccw(c50.91,16.349) 50.763,16.349 50.763,15.344 ccw(c50.885,15.344) 50.885,15.222 51.027,15.222 cw(c51.027,15.049) 51.2,15.049 51.2,14.292 ccw(c51.343,14.292) 51.343,14.149 51.718,14.149 ccw(c51.718,14.519) 52.088,14.519 52.088,15.061 cw(c52.634,15.061) 52.634,15.606 53.792,15.606 ccw(c53.792,15.958) 54.144,15.958
VDD_PLL2OSC on Bottom Layer "VDD_PLL2OSC_L06_P073" (solid, remove dead copper, pour order 73): 53.073,25.444 54.684,25.444 55.193,24.935 55.193,24.561 55.663,24.091 55.894,24.091 56.063,23.922 56.063,22.806 55.823,22.806 55.823,23.427 55.643,23.606 53.603,23.606 53.078,24.131 53.078,24.176
VDDO_9/10 on Bottom Layer "VDDO_9/10_L06_P107" (solid, pour order 107): 51.15,19.943 52.737,19.943 cw(c52.737,19.836) 52.845,19.836 ccw(c52.883,19.836) 52.883,19.798 53.934,19.798 ccw(c53.934,19.956) 54.093,19.956 54.093,19.957 ccw(c53.874,19.957) 53.874,20.175 53.112,20.175 cw(c53.112,20.236) 53.051,20.236 53.051,20.63 ccw(c52.845,20.63) 52.845,20.836 52.722,20.836 cw(c52.722,20.948) 52.61,20.948 ccw(c52.532,20.948) 52.532,21.027 51.256,21.027 ccw(c51.256,20.928) 51.157,20.928
VDDO_7/8 on Bottom Layer "VDDO_7/8_L06_P121" (solid, pour order 121): 51.15,17.142 51.253,17.039 52.157,17.039 52.285,17.167 52.285,17.443 52.778,17.443 52.909,17.312 54.083,17.312 ccw(c54.058,17.336) 54.093,17.336 54.093,17.576 ccw(c54.018,17.576) 54.018,17.651 53.201,17.651 cw(c53.201,17.699) 53.154,17.699 53.154,18.341 52.777,18.718 51.333,18.718 51.15,18.534
2122_VCC on Bottom Layer "2122_VCC_L06_P166" (solid, remove dead copper, pour order 166): 35.217,26.567 35.145,26.64 33.896,26.64 33.782,26.526 33.782,25.243 33.66,25.121 33.66,24.216 33.7,24.176 34.987,24.176 35.094,24.283 35.094,25.653 35.167,25.726 35.505,25.726 35.567,25.789 35.567,26.442 ccw(c35.442,26.442) 35.442,26.567
2122_VCC on Bottom Layer "2122_VCC_L06_P097" (solid, pour order 97): 41.993,33.857 cw(c42.119,33.857) 42.119,33.983 42.814,33.983 cw(c42.811,33.665) 43.129,33.663 43.129,32.374 ccw(c43.289,32.374) 43.289,32.214 cw(c43.289,32.06) 43.443,32.06 43.443,31.317 cw(c43.193,31.317) 43.193,31.067 41.706,31.067 cw(c41.706,31.531) 41.242,31.531 41.242,32.119 ccw(c40.956,32.119) 41.237,32.175 41.237,33.062 cw(c41.378,33.062) 41.378,33.203 41.456,33.203 ccw(c41.456,33.74) 41.993,33.74
PGND on Bottom Layer "PGND_L06_P197" (solid, remove dead copper, pour order 197): 1.346,29.329 8.673,22.002 11.499,22.002 13.203,20.298 13.203,14.61 18.762,9.051 18.762,5.967 4.838,5.967 4.171,5.3 4.171,3.752 3.975,3.556 1.829,3.556 1.346,4.039
no net on Bottom Layer "NONET_L06_P189" (solid, remove dead copper, pour order 189): 56.823,15.606
no net on Bottom Layer "NONET_L06_P184" (solid, remove dead copper, pour order 184): 8.017,80.432
NetC185_U_ATT1_1 on Bottom Layer "NETC185_U_ATT1_1_L06_P167" (solid, remove dead copper, pour order 167): 13.82,69.225 13.82,69.875 cw(c13.926,69.875) 13.926,69.981 14.976,69.981 cw(c14.976,69.581) 15.376,69.581 15.376,69.557 ccw(c15.752,69.557) 15.752,69.181 16.304,69.181 cw(c16.304,68.591) 16.894,68.591 cw(c16.529,68.591) 16.529,68.225 15.732,68.225 ccw(c15.732,67.937) 15.444,67.937 cw(c15.188,67.937) 15.188,67.681 14.426,67.681 cw(c14.426,67.831) 14.276,67.831 14.276,68.831 ccw(c13.926,68.831) 13.926,69.181 13.863,69.181 cw(c13.863,69.225)
GND on Layer 4 "GND_L05_P174" (solid, remove dead copper, pour order 174): 9.846,43.739 8.915,43.739 6.274,41.097 6.274,23.52 7.899,21.895 11.369,21.895 12.725,20.539 12.725,11.862 15.117,9.471 20.704,9.471 24.917,5.257 24.917,2.54 30.023,2.54 30.29,2.808 30.29,3.925 30.531,4.166 31.674,4.166 31.977,3.862 31.977,2.922 32.334,2.565 47.219,2.565 48.209,3.556 68.301,3.556 69.621,4.877 69.621,38.537 67.34,40.818 64.885,40.818 62.065,43.637 61.544,43.637
GND_ATT_U_ATT1 on Layer 4 "GND_ATT_U_ATT1_L05_P170" (solid, remove dead copper, pour order 170): 8.118,46.84 ccw(c10.658,46.84) 10.658,44.3 61.202,44.3 ccw(c61.202,46.84) 63.742,46.84 63.703,49.578 63.703,78.595 ccw(c61.163,78.595) 61.163,81.135 8.514,81.135 ccw(c8.514,80.74) 8.118,80.74
no net on Layer 4 "NONET_L05_P173" (solid, remove dead copper, pour order 173): 33.985,43.282

## Silkscreen, mask and mechanical layers (free items; w line width, h text height)
Bottom Overlay:
  drawing of 42 lines, arcs and shapes, not listed
PCI-SIG Outline:
  lines w0.1: 21.35,3.2 cw(c21.35,2.4) 22.15,2.4
Mechanical14:
  text "Zegar referencyjny z MB na dystrybutor na karcie CLKIN nie jest powiązonay długością" at -76.665,79.123 h1
  text "Sygnał CLK do FPGA oraz Sysref do złącza karty RF są powiązane" at -76.865,75.923 h1
  text "Sygnał danych oraz SYNC z ADC do FPGA są powiązane ze sobą" at -76.865,73.148 h1
  text "Sygna zegarowy z Zegara do ADC oraz SYSREF z zegara do ADC są powiązane" at -76.79,70.548 h1

## Dimensions
0,83.2 to 70,83.2 on TopLayer
70,3.2 to 70,83.2 on TopLayer
22.15,0 to 0,83.2 on TopLayer